# Altium PCB PCI Express Mini L1_V1.PCBDOC (part 8 of 9)
Units mm, origin at the board's own origin, x right, y up, seen from the top; angles counter-clockwise.
Board outline 70 x 83.2 mm, 6 copper layers (TopLayer, Layer 1, Layer 2, Layer 3, Layer 4, Bottom Layer), stack 0.914 mm thick; 442 components, 259 nets, 1412 pads, 857 vias.
Unrouted connection lines stored in the file: 2.
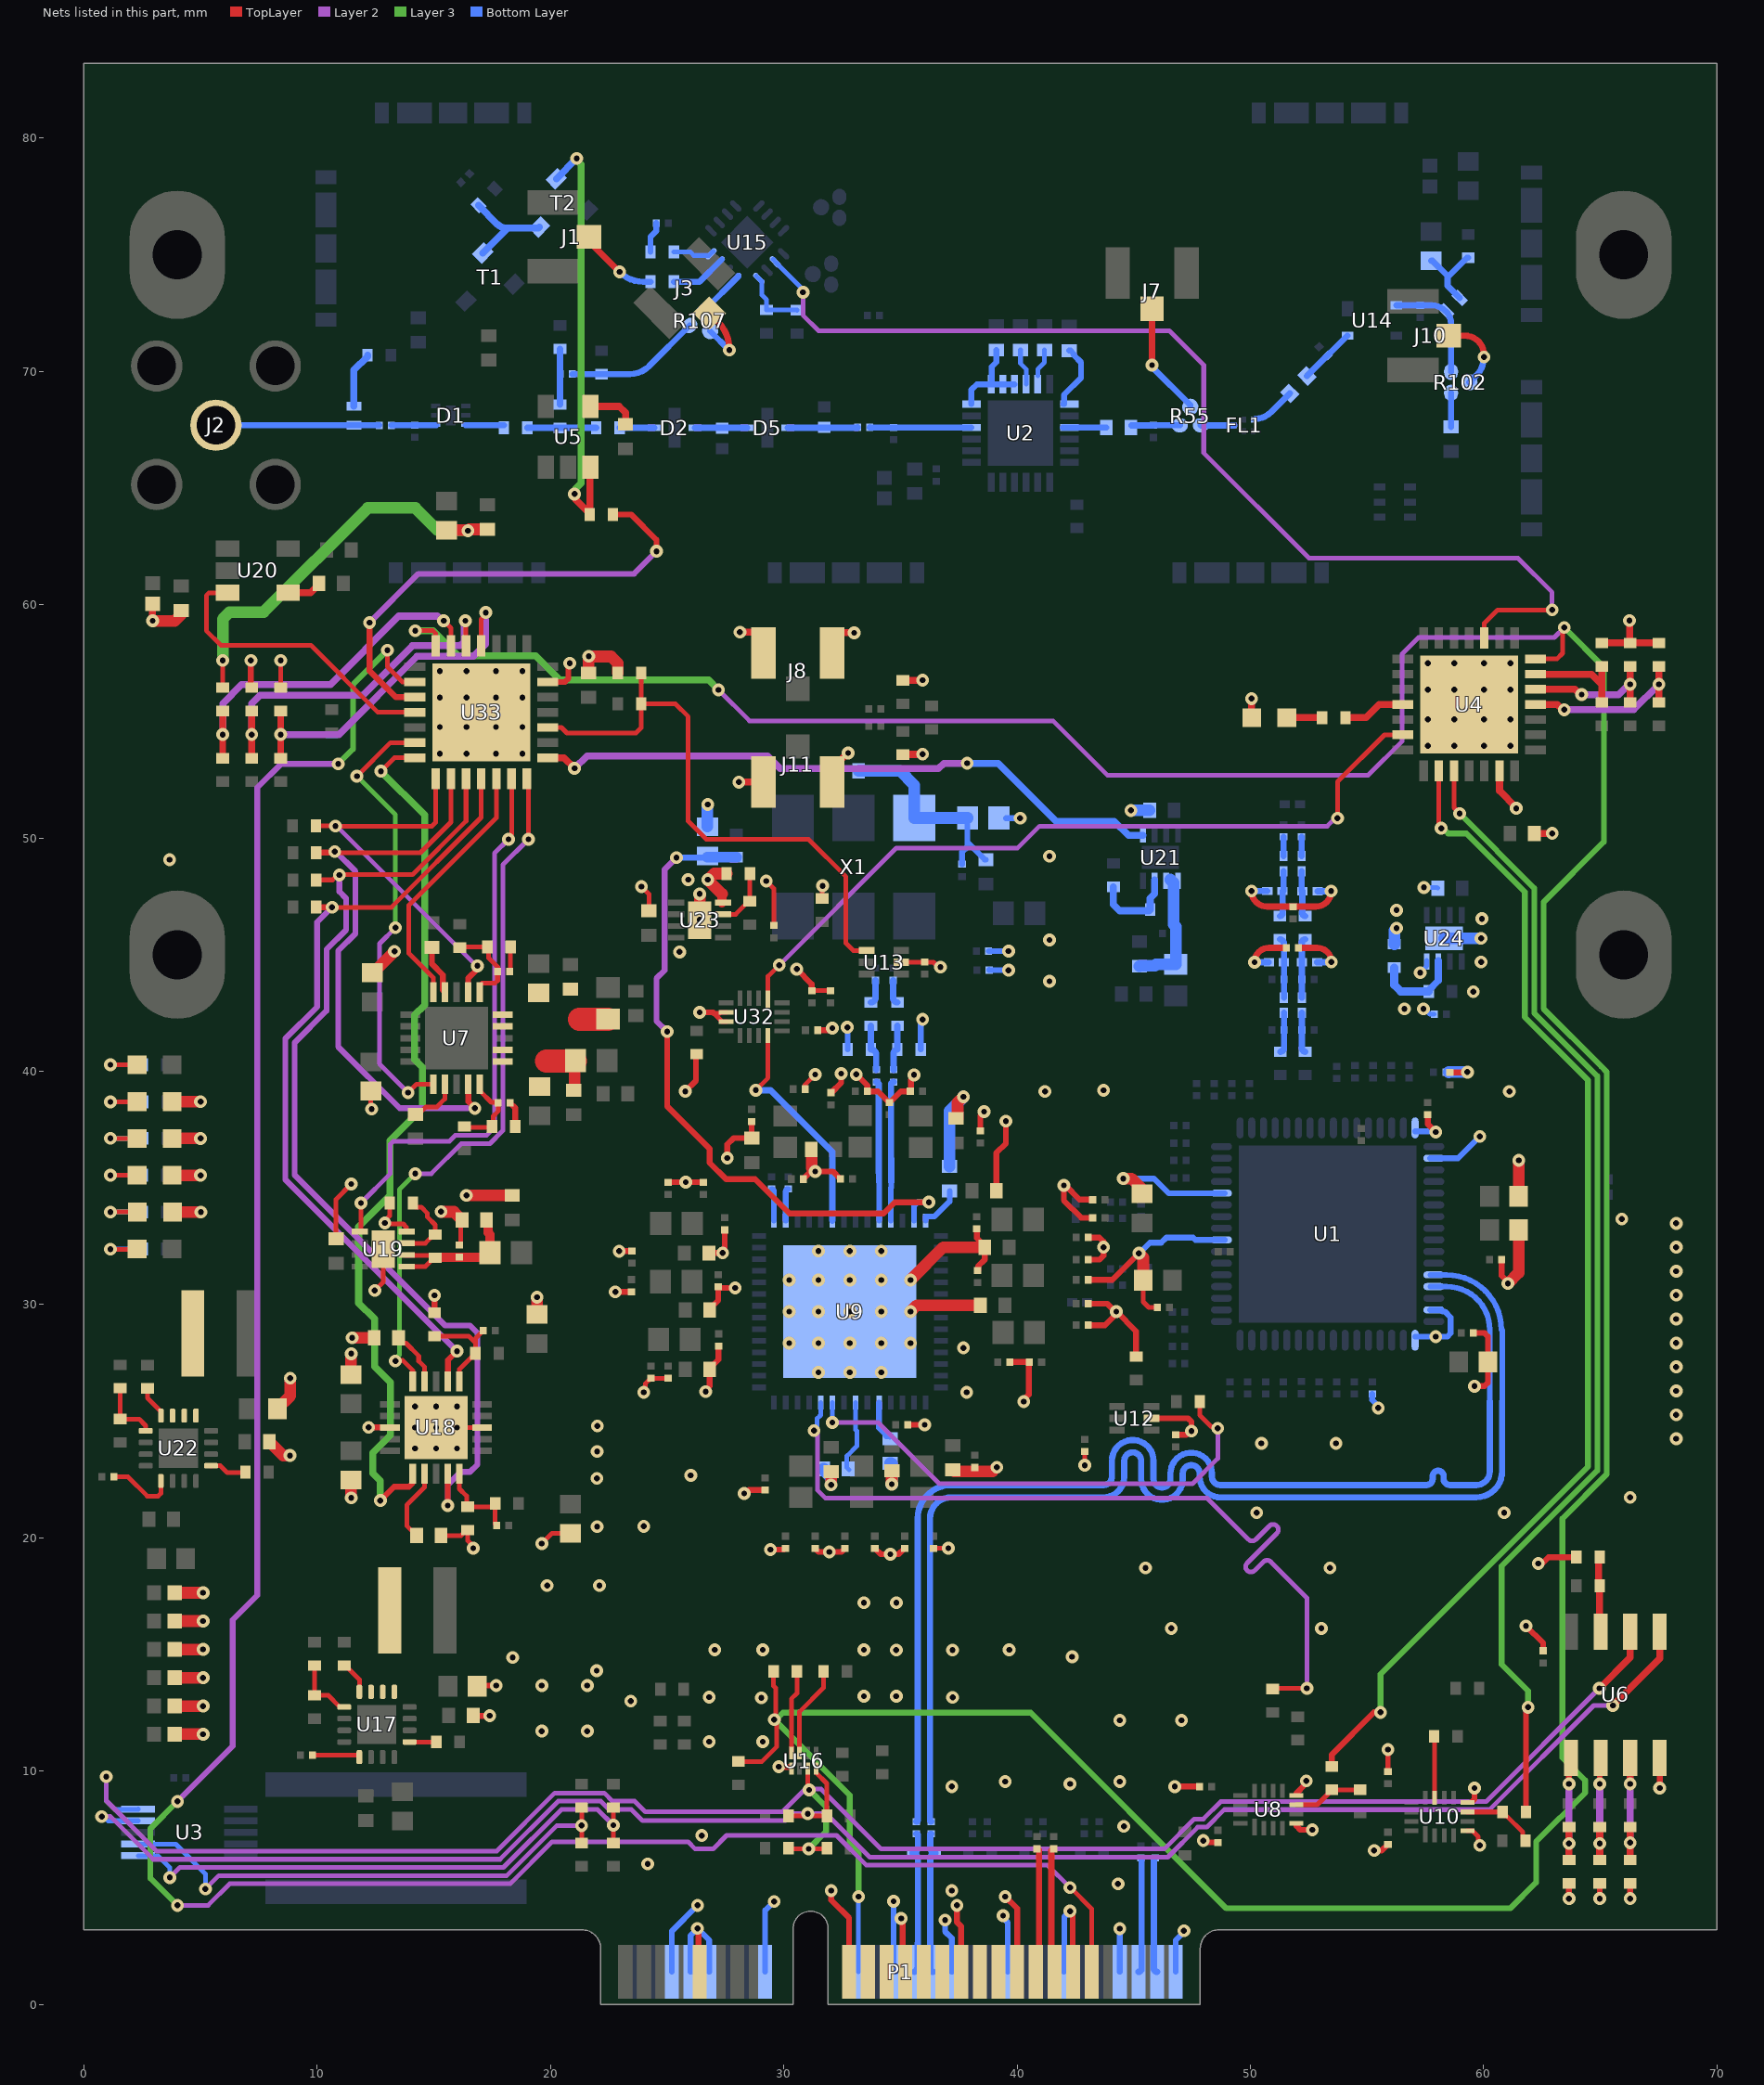
[diagram p8: the nets of this part, all layers, seen from the top]

## Via types
v1: diameter 0.55, hole 0.25, TopLayer to Bottom Layer, tented both sides, 782 vias
v2: diameter 0.55, hole 0.25, TopLayer to Bottom Layer, 40 vias
v3: diameter 0.5, hole 0.2, TopLayer to Bottom Layer, 25 vias
v4: diameter 0.35, hole 0.2, TopLayer to Bottom Layer, 10 vias

## Nets (pads, with @x,y where several pads share a name; then routed paths per layer and width w, separated by ;. In a path a pad name is that pad's centre, name@x,y a point inside that pad or via, vN(x,y) a via of type N, cw(c..) or ccw(c..) an arc to the next point about the centre after c; other vN are vias at no path point) (continued)
CMLout4_ADC_N: C38.1 U1.28 | length 53.9
  Bottom Layer w0.24: U1.28@57.708,31.275 58.408,31.275 cw(c58.408,28.923) 60.761,28.923 cw(c60.761,28.895) 60.789,28.895 60.789,25.857
  Bottom Layer w0.268: C38.1@36.319,7.841 cw(c36.319,7.895) 36.265,7.895 36.265,20.824 cw(c37.18,20.824) 37.18,21.738 43.304,21.738 43.702,21.738 ccw(c43.702,22.629) 44.592,22.629 44.592,23.305 cw(c44.955,23.305) 45.318,23.305 45.318,22.522 ccw(c46.208,22.522) 47.099,22.522 47.099,22.761 cw(c47.461,22.761) 47.824,22.761 47.824,22.629 ccw(c48.715,22.629) 48.715,21.738 55.688,21.738 59.674,21.738 ccw(c59.674,22.853) 60.789,22.853 60.789,25.857
CMLout4_ADC_P: C39.1 U1.29 | length 53.9
  Bottom Layer w0.24: U1.29@57.708,30.775 58.408,30.775 cw(c58.408,28.923) 60.261,28.923 60.261,25.857
  Bottom Layer w0.268: C39.1@35.684,7.841 ccw(c35.684,7.895) 35.737,7.895 35.737,20.824 cw(c37.18,20.824) 37.18,22.266 43.304,22.266 43.702,22.266 ccw(c43.702,22.629) 44.064,22.629 44.064,23.305 cw(c44.955,23.305) 45.846,23.305 45.846,22.522 ccw(c46.208,22.522) 46.571,22.522 46.571,22.761 cw(c47.461,22.761) 48.352,22.761 48.352,22.629 ccw(c48.715,22.629) 48.715,22.266 55.688,22.266 56.975,22.266 57.41,22.266 57.544,22.266 ccw(c57.544,22.534) 57.812,22.534 57.812,22.645 cw(c58.047,22.645) 58.283,22.645 58.283,22.534 ccw(c58.551,22.534) 58.551,22.266 59.468,22.266 59.674,22.266 ccw(c59.674,22.853) 60.261,22.853 60.261,25.857
CMLout4_N: C38.2 P1.26 R113.2 | length 6.3
  Bottom Layer w0.268: C38.2@36.319,7.321 ccw(c36.319,7.275) 36.272,7.275 36.272,6.729 ccw(c36.508,6.729) 36.508,6.493 ccw(c36.508,6.257) 36.272,6.257 36.272,1.528 ccw(c36.4,1.528) P1.26@36.4,1.4
CMLout4_P: C39.2 P1.24 R113.1 | length 6.3
  Bottom Layer w0.268: P1.24@35.6,1.4 ccw(c35.468,1.633) 35.736,1.634 35.736,2.55 cw(c36.1,2.55) 35.741,2.609 ccw(c35.476,2.653) 35.744,2.654 35.744,6.257 ccw(c35.508,6.257) R113.1@35.508,6.493 ccw(c35.508,6.729) 35.744,6.729 35.744,7.26 ccw(c35.684,7.26) C39.2@35.684,7.321
CTRL_VCXO: C222.1 R89.1 U9.41 | length 29
  TopLayer w0.25: v1(25.001,41.702) 25.001,38.505 26.823,36.683 26.823,36.082 27.526,35.379 28.769,35.379 30.242,33.905 34.27,33.905 34.754,34.389 v1(36.215,34.389)
  Layer 2 w0.25: v1(25.001,41.702) 24.54,42.163 24.54,43.982 24.887,44.329 24.887,48.654 v1(25.397,49.164)
  Bottom Layer w0.25: v1(25.397,49.164) 26.657,49.164 C222.1@26.728,49.235 ; R89.1@27.969,49.179 R89.1@28.06,49.088 ; U9.41@35.581,33.6 35.584,33.602 35.584,34.242 35.73,34.389 v1(36.215,34.389)
  Bottom Layer w0.45: C222.1@26.714,49.179 R89.1@27.969,49.179
EN_1V8_LDO1: U18.6 U33.21 | length 38.3
  TopLayer w0.2: v1(12.728,52.864) 13.305,53.441 U33.21@14.18,53.441
  TopLayer w0.25: v1(12.705,21.602) 13.297,22.195 13.931,22.195 14.078,22.341 14.078,22.742 U18.6@14.093,22.757
  Layer 3 w0.3: v1(12.705,21.602) 12.705,22.445 12.374,22.776 12.374,23.639 13.136,24.401 13.136,26.669 12.465,27.339 12.465,29.385 11.775,30.075 11.775,33.334 13.125,34.684 13.125,37.035 14.508,38.418 14.508,38.819 14.517,38.829 14.517,40.169 14.175,40.512 14.175,42.415 14.604,42.844 14.604,50.988 v1(12.728,52.864)
EN_1V25_LDO0: U7.20 U33.26 | length 11.1
  TopLayer w0.2: U7.20@14.97,43.398 14.97,44.017 13.926,45.061 13.926,47.115 17.68,50.869 U33.26@17.68,52.541
EN_1V25_LDO2: U19.5 U33.27 | length 24.3
  TopLayer w0.2: U19.5@11.877,33.13 v1(11.877,34.355) ; v1(18.2,49.95) 18.2,50.045 18.33,50.175 U33.27@18.33,52.541
  Layer 2 w0.2: v1(11.877,34.355) 13.136,35.614 13.136,36.883 13.253,37 15.663,37 15.914,37.25 17.255,37.25 17.604,37.599 17.604,49.355 v1(18.2,49.95)
EN_2V5_LDO0: U7.6 U33.20 | length 19.3
  TopLayer w0.2: v1(11.7,52.649) 13.142,54.091 U33.20@14.18,54.091 ; v1(13.892,39.088) 14.252,39.448 U7.6@14.97,39.448
  Layer 2 w0.2: v1(13.351,46.158) 12.667,45.474 12.667,40.313 v1(13.892,39.088)
  Layer 3 w0.2: v1(11.7,52.649) 13.351,50.999 v1(13.351,46.158)
EN_3V3_LDO1: U18.20 U33.28 | length 29.9
  TopLayer w0.2: v1(13.351,27.582) 13.387,27.618 13.659,27.618 14.093,27.184 U18.20@14.093,26.707 ; U33.28@18.98,52.541 19.053,52.468 v1(19.053,49.95)
  Layer 2 w0.2: v1(14.202,35.614) 14.892,35.614 16.178,36.9 17.4,36.9 17.954,37.454 17.954,48.852 v1(19.053,49.95)
  Layer 3 w0.2: v1(13.351,27.582) 13.351,27.677 13.525,27.851 13.525,34.937 v1(14.202,35.614)
EN_3V3_LDO3: U21.5 U33.1 | length 27.5
  TopLayer w0.3: U33.1@19.88,53.441 20.578,53.441 v1(21.028,52.991)
  Layer 2 w0.3: v1(21.028,52.991) 21.562,53.525 29.299,53.525 29.851,52.973 36.621,52.973 36.855,53.206 v1(37.855,53.206)
  Bottom Layer w0.3: v1(37.855,53.206) 39.193,53.206 41.682,50.718 44.165,50.718 44.769,50.114 U21.5@45.394,50.114
EN_5V: U20.3 U33.18 | length 12.9
  TopLayer w0.2: U20.3@6.158,60.512 5.362,60.512 5.244,60.395 5.244,58.888 5.877,58.256 9.734,58.256 12.599,55.391 U33.18@14.18,55.391
EN_ANT_SUPP: R32.1 U33.17 | length 20.8
  TopLayer w0.25: v1(12.244,59.232) 12.244,57.164 13.368,56.041 U33.17@14.18,56.041 ; R32.1@22.676,63.869 23.46,63.869 24.541,62.787 v1(24.541,62.29)
  Layer 2 w0.25: v1(12.244,59.232) 14.337,61.325 23.576,61.325 v1(24.541,62.29)
EN_RF_P: U4.17 U15.14 | length 46.6
  TopLayer w0.2: U4.17@60.025,58.575 60.025,59.209 60.594,59.779 v1(62.933,59.779)
  Layer 2 w0.2: v1(30.822,73.393) 30.822,72.414 31.484,71.751 46.52,71.751 48,70.272 48,66.507 52.509,61.997 61.467,61.997 62.933,60.531 v1(62.933,59.779)
  Bottom Layer w0.2: U15.14@29.529,74.796 U15.14@29.564,74.796 ; U15.14@29.635,74.69 30.755,73.571 30.755,73.46 v1(30.822,73.393)
EN_SPI_AD: R18.2 U4.3 | length 49.4
  TopLayer w0.2: U4.3@58.725,52.875 58.725,51.296 v1(58.971,51.05)
  TopLayer w0.25: R18.2@61.809,8.253 61.809,12.571 61.9,12.663 v2(61.9,12.744)
  Layer 3 w0.25: v1(58.971,51.05) 62.167,47.854 62.167,42.493 64.447,40.213 64.871,39.789 64.871,25.857 64.871,22.89 60.77,18.789 60.77,14.579 61.9,13.449 v2(61.9,12.744)
EN_SPI_LMK: R145.2 U4.2 | length 50.5
  TopLayer w0.2: U4.2@58.075,52.875 58.075,50.521 v1(58.178,50.418)
  TopLayer w0.25: R145.2@53.489,10.203 53.489,10.711 55.303,12.525 v2(55.575,12.525)
  Layer 3 w0.25: v2(55.575,12.525) 55.575,14.16 64.471,23.056 64.471,25.857 64.471,39.623 63.881,40.213 61.767,42.327 61.767,47.688 59.256,50.2 58.474,50.2 58.256,50.418 v1(58.178,50.418)
FB_3V6: R118.1 R121.2 U17.5 | length 2.8
  TopLayer w0.2: R118.1@9.881,14.528 R121.2@9.881,13.253 10.476,13.253 10.976,12.753 U17.5@11.156,12.753
FB_6V: R122.1 R125.2 U22.5 | length 2.7
  TopLayer w0.2: R122.1@1.56,26.417 R125.2@1.56,25.092 2.367,25.092 2.65,24.809 U22.5@2.65,24.592
FD_AD9690_3V3: R63.1 R117.2 U13.4 U33.3 | length 24.9
  TopLayer w0.2: U33.3@19.88,54.741 20.466,54.741 20.703,54.504 23.662,54.504 23.887,54.729 R63.1@23.887,55.751 ; R117.2@23.887,57.076 R63.1@23.887,55.751 ; U13.4@33.554,45.176 32.981,45.176 32.661,45.496 32.661,48.343 31.054,49.95 26.676,49.95 25.901,50.725 25.901,55.202 25.352,55.751 R63.1@23.887,55.751
GND: C19.2 C20.2 C23.1 C26.1 C37.1 C40.1 C43.1 C48.1 C49.1 C50.1 C52.1 C54.1 C55.1 C57.1 C58.2 C59.2 C60.1 C62.1 C64.1 C65.1 C70.1 C73.1 C74.1 C75.1 C76.1 C79.1 C80.1 C81.1 C88.1 C89.1 C91.1 C92.1 C94.1 C95.1 C96.1 C97.1 C126.1 C127.1 C132.1 C133.1 C134.1 C136.1 C137.1 C138.1 C139.1 C150.1 C151.1 C152.1 C153.1 C154.1 C155.1 C156.1 C157.1 C158.1 C159.1 C160.1 C161.1 C162.1 C163.1 C164.1 C165.1 C166.1 C167.1 C171.2 C172.2 C173.2 C174.1 C180.1 C181.1 C182.1 C184.1 C190.1 C191.1 C192.1 C193.1 C194.1 C195.1 C196.1 C197.1 C198.1 C199.1 C200.1 C201.1 C202.1 C203.1 C204.1 C205.1 C206.1 C207.1 C208.1 C211.1 C212.1 C213.1 C214.1 C215.1 C216.1 C217.1 C218.1 C222.2 C239.2 C240.1 C241.1 C242.1 C243.2 C244.2 D4.2 D6.2 D8.2 D9.2 D10.2 FB1.2 FB5.2 FB6.2 FB11.1 FB13.2 FB14.2 FB29.2 FB30.2 J8.1 J8.3 J11.1 J11.3 P1.6 P1.8 P1.9 P1.10 P1.16 P1.17 P1.22 P1.23 P1.28 P1.29 P1.34 P1.35 P1.40 P1.41 P1.46 P1.52 R20.1 R25.1 R26.1 R28.1 R35.1 R41.1 R45.1 R47.1 R53.1 R61.1 R65.1 R67.1 R70.1 R71.1 R79.2 R84.1 R97.1 R108.1 R109.1 R117.1 R119.1 R127.1 R131.1 U1.16 U1.18 U1.31 U1.33 U1.56 U1.60 U4.6 U4.29 U6.4 U8.5 U8.8 U9.57 U10.5 U10.8 U12.2 U13.2 U16.1 U18.3 U18.13 U18.21 U19.4 U19.9 U23.4 U23.9 U24.4 U24.9 U32.6 U32.7 U33.6 U33.29 | length 260.9
  TopLayer w0.2: R35.1@5.95,56.449 v1(5.95,57.61) ; R47.1@8.436,56.449 v1(8.436,57.61) ; C62.1@10.806,32.82 10.806,34.518 v1(11.454,35.166) ; C40.1@12.298,39.156 12.298,38.424 v1(12.336,38.385) ; v1(12.465,30.606) 12.827,30.967 U19.9@12.827,32.38 ; R53.1@13.106,34.355 13.106,33.802 12.9,33.596 v1(12.9,33.501) 12.94,33.461 13.682,33.461 13.827,33.316 U19.4@13.827,33.13 ; v1(15.093,24.732) v1(15.993,24.732) U18.13@17.068,24.732 ; C59.2@15.306,20.1 16.163,20.1 16.401,20.338 R65.1@16.451,20.338 16.451,19.885 16.685,19.651 v1(16.685,19.557) ; C64.1@16.087,32.555 16.097,32.555 16.147,32.605 16.147,33.571 C75.1@16.206,33.63 ; v2(19.625,19.761) 20.063,20.199 C54.1@20.848,20.199 ; v1(23.896,47.92) 24.221,47.595 C96.1@24.221,46.879 ; v1(23.993,26.24) 24.06,26.307 24.06,26.61 24.29,26.84 C182.1@24.3,26.84 C181.1@25.047,26.84 ; 26.861,42.532 26.954,42.532 ; U32.7@27.524,42.136 27.349,42.136 26.997,42.489 27.251,42.489 27.299,42.536 U32.6@27.524,42.536 ; v1(29.244,48.158) 29.571,47.831 C97.1@29.571,46.249 ; C158.1@30.915,39.238 30.915,39.435 v1(31.342,39.862) ; C240.1@31.199,43.456 C26.1@31.995,43.456 ; R61.1@31.639,47.41 31.65,47.421 31.65,47.942 v1(31.66,47.952) ; U13.2@35.034,44.676 36.414,44.676 36.622,44.468 v1(36.717,44.468) ; C196.1@36.425,19.557 v1(37.05,19.557) ; v1(42.9,23.112) C94.1@42.9,23.704 ; C80.1@45.404,31.05 45.404,30.122 45.645,29.881 C134.1@46.009,29.881 ; C20.2@55.895,9.978 v1(55.895,10.925) ; U10.5@59.303,7.453 59.503,7.453 59.768,7.188 59.768,6.888 v1(59.835,6.821)
  TopLayer w0.25: v1(7.155,57.61) 7.155,56.485 R45.1@7.192,56.449 ; v1(12.202,24.739) 12.204,24.737 13.112,24.737 U18.3@13.118,24.732 ; R67.1@15.023,29.65 15.023,30.394 v1(15.03,30.401) ; C59.2@15.306,20.1 C59.2@15.309,20.103 ; C49.1@16.685,12.389 16.706,12.368 17.377,12.368 v1(17.392,12.383) ; C48.1@16.856,13.643 16.881,13.668 v1(17.675,13.668) ; U33.6@19.88,56.691 20.62,56.691 20.767,56.837 20.767,57.434 v1(20.824,57.491) ; v1(22.779,30.545) C199.1@23.332,30.545 ; v1(22.943,32.292) C200.1@23.496,32.292 ; C212.1@25.047,35.248 v1(25.798,35.248) C211.1@26.548,35.248 ; v1(25.773,39.143) 26.237,39.607 26.237,40.711 R108.1@26.262,40.736 ; v1(26.298,3.26) 26.345,3.212 26.345,1.455 P1.9@26.4,1.4 ; v1(26.396,42.532) 26.861,42.532 ; v1(26.649,26.27) 26.649,26.338 26.823,26.512 C190.1@26.823,27.22 26.823,27.27 27.199,27.646 C184.1@27.199,28.227 ; C214.1@26.771,32.222 27.37,32.222 27.37,32.262 27.465,32.357 C213.1@27.465,33.201 ; C202.1@26.823,29.776 26.823,29.826 27.191,30.193 C201.1@27.191,30.767 ; 26.954,42.532 26.997,42.489 ; C201.1@27.232,30.712 v1(27.914,30.712) ; v1(27.576,36.288) 27.576,36.866 27.847,37.138 C161.1@28.624,37.138 C159.1@28.624,37.852 ; v1(28.3,21.904) 28.368,21.904 28.515,22.051 C152.1@29.195,22.051 ; v1(29.425,19.5) 30.007,19.5 C150.1@30.063,19.557 ; v2(29.786,10.188) v2@29.831,10.188 ; v2@29.832,10.187 U16.1@30.301,10.187 ; v1(30.555,44.382) 31.199,43.738 C240.1@31.199,43.456 ; C160.1@30.842,35.379 30.842,35.389 v1@31.199,35.746 ; C151.1@31.342,19.557 31.499,19.4 v1(31.95,19.4) 32.464,19.4 C166.1@32.621,19.557 ; v1(31.342,35.707) 32.103,35.707 32.387,35.424 32.397,35.424 32.422,35.399 C217.1@32.422,35.389 ; C239.2@31.446,41.763 31.906,41.763 31.995,41.852 v1(32.077,41.852) ; v1(32.028,4.882) 32.028,4.48 32.8,3.708 P1.17@32.8,1.4 ; C215.1@32.029,39.088 32.039,39.088 32.461,39.51 v1(32.461,39.902) ; v1(33.104,39.868) 33.581,39.391 C216.1@33.581,39.141 34.038,39.141 34.519,38.66 C154.1@34.529,38.66 34.539,38.66 35.019,39.141 C155.1@35.421,39.141 35.446,39.166 35.446,39.646 35.581,39.781 v1(35.581,39.849) ; C167.1@33.9,19.557 34.157,19.3 v1(34.565,19.3) 34.922,19.3 C195.1@35.179,19.557 ; v1(35.029,3.69) 35.029,3.622 35.098,3.553 35.098,1.502 P1.23@35.2,1.4 ; C174.1@35.306,24.851 v1(36.035,24.851) ; v1(37.42,4.252) 37.42,3.529 37.6,3.349 P1.29@37.6,1.4 ; C164.1@38.272,33.252 38.272,32.849 38.613,32.507 C194.1@38.613,32.457 38.613,31.929 38.338,31.654 38.338,31.494 38.313,31.469 C193.1@38.303,31.469 ; C156.1@38.427,37.453 38.427,38.109 v1(38.587,38.269) ; C165.1@39.111,34.881 39.111,36.506 39.52,36.915 v1(39.52,37.862) ; v1(39.488,4.625) 40,4.114 P1.35@40,1.4 ; C205.1@39.695,27.541 C204.1@40.529,27.541 40.5,27.513 40.5,26.144 40.282,25.927 v1(40.282,25.845) ; v1(42.268,4.003) 42.379,3.892 42.379,1.421 P1.41@42.4,1.4 ; C203.1@43.052,29.119 43.766,29.119 v1@44.278,29.632 ; C191.1@43.052,30.037 43.873,30.037 44.23,29.68 v1(44.254,29.704) 45.1,28.857 R109.1@45.1,27.77 R109.1@45.1,27.697 ; C192.1@43.052,31.053 C192.1@43.052,31.063 44.082,31.063 v1(45.221,32.201) ; C163.1@43.052,31.932 43.539,31.932 43.701,32.095 v1(43.701,32.46) 43.701,32.702 43.527,32.877 C162.1@43.052,32.877 ; C139.1@43.236,33.721 42.749,33.721 42,34.471 v1(42,35.11) 42.066,35.11 42.674,34.502 C138.1@43.236,34.502 ; U12.2@45.76,25.127 45.761,25.126 47.329,25.126 47.476,24.979 v1(47.476,24.577) 47.408,24.577 47.253,24.422 C95.1@46.8,24.422 ; v1(46.755,9.342) C244.2@47.815,9.342 ; v1(47.977,7.025) 48.059,7.025 48.137,6.947 C243.2@48.608,6.947 ; U8.5@51.97,7.658 52.141,7.488 v1(52.655,7.488) ; 51.97,9.058 52.357,9.445 52.357,9.545 v1(52.395,9.583) ; v1(55.303,6.6) 55.628,6.6 C19.2@55.895,6.868 ; C132.1@57.593,38.14 57.609,38.125 57.609,37.735 v1(57.943,37.402) ; C133.1@58.552,39.945 58.564,39.957 59.288,39.957 v1(59.3,39.968) ; U10.8@59.478,8.678 59.606,8.807 v1(59.606,9.278) ; C88.1@59.56,28.787 60.032,28.787 60.178,28.64 C73.1@60.178,27.541 60.178,26.651 60.032,26.504 v1(59.606,26.504) ; C89.1@60.77,31.925 60.77,31.241 61.039,30.971 v1(61.039,30.904) ; v1(61.809,16.228) 62.55,15.487 C50.1@62.55,15.17 ; v1(62.339,18.9) 62.503,18.9 62.778,19.175 R20.1@63.973,19.175 ; v1(63.656,4.54) R70.1@63.656,5.195 ; v1(64.973,4.54) R71.1@64.973,5.195 ; v1(66.275,4.54) R119.1@66.275,5.195 ; v1(67.545,9.274) U6.4@67.545,10.575
  TopLayer w0.3: v1(2.944,59.31) FB11.1@2.944,60.039 ; C70.1@17.173,63.113 C70.1@17.291,63.232 ; v1(28.071,52.398) J11.3@29.123,52.398 ; v1(28.117,58.826) 28.748,58.826 29.123,58.451 J8.1@29.123,57.926 ; J11.1@32.073,52.398 32.073,52.973 32.748,53.648 v1(32.757,53.648) ; J8.3@32.073,57.926 32.073,58.425 32.448,58.8 v1(33.015,58.8) ; R41.1@35.107,56.753 35.113,56.758 35.942,56.758 v1(35.948,56.764) ; R97.1@35.108,53.575 35.12,53.586 35.936,53.586 v1@35.938,53.589 ; v1(50.047,55.978) 50.053,55.972 50.053,55.169 D10.2@50.058,55.163 ; U4.6@60.675,52.875 60.678,52.872 60.678,52.024 61.392,51.311 v1(61.392,51.273) ; C241.1@62.175,50.2 v1(62.933,50.2) ; R28.1@65.066,58.36 R26.1@66.275,58.36 ; v1(66.25,59.325) 66.262,59.313 66.262,58.373 R26.1@66.275,58.36 ; R25.1@67.51,58.36 R26.1@66.275,58.36
  TopLayer w0.4: U23.4@27.346,47.229 27.346,47.606
  TopLayer w0.5: v1(2.944,59.31) 3.897,59.31 4.175,59.589 C60.1@4.175,59.75 ; D9.2@3.781,35.543 v1@5,35.543 ; D8.2@3.781,37.125 v1@5,37.125 ; D6.2@3.781,38.7 v1(5,38.7) ; D4.2@3.794,33.968 v1(5.013,33.968) ; FB1.2@3.889,11.588 v1(5.108,11.588) ; FB30.2@3.889,12.792 v1(5.108,12.791) ; FB13.2@3.889,14.006 v1(5.108,14.006) ; FB6.2@3.889,15.221 v1@5.108,15.221 ; FB14.2@3.889,16.435 v1(5.108,16.435) ; FB5.2@3.889,17.65 v1(5.108,17.65) ; C92.1@7.946,24.127 8.542,23.53 v1(8.835,23.53) ; C91.1@8.296,25.542 8.845,26.092 v1(8.845,26.85) ; v2(11.454,21.718) C52.1@11.454,22.482 ; C55.1@11.454,27.003 v1(11.454,27.896) ; v1(11.498,28.576) C58.2@12.439,28.574 C58.2@12.439,28.574 ; C43.1@12.411,44.352 12.537,44.352 13.311,45.127 v1(13.311,45.141) ; v1(15.302,33.988) 15.312,33.978 15.858,33.978 16.131,33.705 16.181,33.705 16.206,33.68 C75.1@16.206,33.63 ; C37.1@15.545,63.198 16.439,63.198 v1(16.462,63.175) 16.519,63.232 C70.1@17.291,63.232 ; v1(16.395,34.684) v1(16.395,34.684) 18.354,34.682 C76.1@18.356,34.68 ; v1(19.422,30.315) 19.423,30.313 19.423,29.579 C57.1@19.425,29.577 ; C242.1@21.636,57.076 v1(21.636,57.791) 21.645,57.781 22.594,57.781 22.887,57.488 R117.1@22.887,57.076 ; C96.1@24.221,46.879 C96.1@24.223,46.881 ; U23.9@26.396,46.479 v1(26.396,46.5) v1(26.396,47.606) ; 27.346,47.606 v1(26.739,48.214) 26.752,48.214 27.013,48.474 R127.1@27.546,48.474 ; C218.1@31.174,36.658 31.199,36.633 v1@31.199,35.851 ; C153.1@32.024,22.837 32.028,22.834 32.027,22.833 v1(32.027,22.276) ; v1(34.627,22.301) 34.627,22.872 C180.1@34.629,22.874 ; v1(35.431,29.7) 35.704,29.972 C206.1@38.427,29.972 ; v1(35.431,31.05) 36.839,32.457 C194.1@38.613,32.457 ; v1@35.938,53.589 v1(35.948,53.598) ; C198.1@37.237,22.914 37.3,22.851 38.949,22.851 v1(39.127,23.029) ; C157.1@37.375,37.983 37.425,37.983 37.45,38.008 37.45,38.665 v1@37.683,38.898 ; v1(44.551,35.403) 44.902,35.403 45.517,34.788 C81.1@45.517,34.738 ; v1(45.221,32.201) 45.404,32.018 C80.1@45.404,31.05 ; v1(61.039,30.904) 61.5,31.365 C79.1@61.5,33.2 ; C74.1@61.5,34.65 v1(61.5,36.182)
  Layer 3 w0.5: v1(5.95,57.61) 5.95,59.389 6.243,59.682 7.705,59.682 12.173,64.15 14.208,64.15 15.183,63.175 v1(16.462,63.175)
  Bottom Layer w0.2: v1@57.275,44.233 57.553,44.51 U24.4@57.553,44.7 U24.4@57.553,44.75 ; v1(57.414,42.675) 57.47,42.675 57.693,42.452 C127.1@57.883,42.452 ; v1(57.435,47.884) 57.994,47.884 C126.1@58.028,47.85
  Bottom Layer w0.25: P1.6@25.2,1.4 25.2,3.149 v1(26.303,4.252) ; P1.8@26,1.4 26,2.956 26.298,3.254 26.303,3.254 26.8,2.757 P1.10@26.8,1.4 ; P1.16@29.2,1.4 29.2,4.035 v1(29.581,4.417) ; v1(32.721,41.887) 32.721,41.852 32.685,41.815 cw(c32.685,41.767) 32.733,41.767 R84.1@32.733,40.937 ; v1(34.701,4.424) 34.701,1.499 P1.22@34.8,1.4 ; R79.2@35.866,40.937 35.866,42.143 v1(35.948,42.225) ; v1(36.912,3.622) 36.912,3.129 37.2,2.841 P1.28@37.2,1.4 ; C208.1@38.781,45.15 v1(39.633,45.15) ; C207.1@38.801,44.346 38.808,44.339 39.626,44.339 v1(39.633,44.332) ; v1(39.398,3.808) 39.398,3.712 39.6,3.511 P1.34@39.6,1.4 ; FB29.2@39.516,50.839 39.523,50.846 40.123,50.846 v1(40.13,50.854) ; P1.40@42,1.4 42.024,1.424 42.024,3.758 v1(42.268,4.003) ; P1.46@44.4,1.4 v1(44.4,3.254) ; v1(44.551,35.403) 45.866,35.403 46.495,34.775 U1.60@48.758,34.775 U1.60@48.908,34.775 ; v1(45.221,32.201) 45.24,32.201 45.69,32.652 46.177,32.652 46.4,32.875 47.541,32.875 47.641,32.775 U1.56@48.758,32.775 U1.56@48.908,32.775 ; P1.52@46.8,1.4 46.8,2.757 47.15,3.107 v1(47.15,3.161) ; C137.1@55.221,26.176 55.221,25.908 55.478,25.652 v1(55.478,25.57) ; U1.33@57.058,28.625 v1(57.943,28.625) 58.437,28.625 58.583,28.771 58.583,29.451 58.334,29.7 58.247,29.7 58.172,29.775 U1.31@57.858,29.775 U1.31@57.708,29.775 ; U1.16@57.058,37.425 57.92,37.425 v1(57.943,37.402) ; U1.18@57.708,36.275 U1.18@57.858,36.275 58.902,36.275 v1(59.835,37.208)
  Bottom Layer w0.5: C222.2@26.728,50.485 26.728,51.411 26.739,51.421 v1(26.739,51.435) ; C172.2@31.702,22.962 31.727,22.937 31.727,22.887 32.028,22.587 32.027,22.586 v1(32.027,22.276) ; C173.2@34.552,23.203 34.602,23.203 34.627,23.178 v1(34.627,22.301) ; C171.2@37.108,35.92 37.108,38.305 37.7,38.897 v1(37.7,38.911) ; v1(44.875,51.185) C65.1@45.677,51.185 ; R131.1@56.168,45.45 56.168,46.031 56.259,46.122 v1(56.259,46.136) ; U24.9@58.303,45.7 v1(59.888,45.7) ; C136.1@58.499,39.96 58.507,39.968 v1(59.3,39.968)
  other v1: 37.2,4.882 44.326,5.168 24.169,6.025 26.484,7.243 44.574,7.638 37.2,9.342 42.268,9.454 39.488,9.558 44.4,9.558 26.8,11.268 29.1,11.268 19.625,11.718 21.575,11.718 44.4,12.182 47.042,12.182 23.439,13.003 29.035,13.145 37.237,13.164 26.8,13.178 33.431,13.215 34.819,13.215 19.625,13.668 21.575,13.668 21.98,14.31 18.376,14.878 42.357,14.904 27.039,15.2 29.096,15.2 33.431,15.2 34.819,15.195 37.229,15.195 39.663,15.2 5.108,15.221 46.604,16.123 53.037,16.123 33.431,17.223 34.826,17.223 19.856,17.956 22.1,17.956 45.5,18.712 53.408,18.712 21.999,20.481 23.993,20.5 50.27,21.079 60.875,21.079 66.275,21.738 21.989,22.55 26.009,22.679 21.999,23.706 14.193,23.832 15.093,23.832 15.993,23.832 50.47,24.052 53.671,24.052 68.25,24.25 14.193,24.732 22.008,24.802 68.25,25.276 14.193,25.632 15.093,25.632 15.993,25.632 37.836,26.24 68.25,26.302 31.481,27.1 32.831,27.1 34.181,27.1 68.25,27.329 37.7,28.145 30.231,28.35 31.481,28.35 32.831,28.35 34.181,28.35 35.431,28.35 68.25,28.355 68.25,29.381 30.231,29.7 31.481,29.7 32.831,29.7 34.181,29.7 68.25,30.407 30.231,31.05 31.481,31.05 32.831,31.05 34.181,31.05 68.25,31.434 27.378,32.215 31.481,32.3 32.831,32.3 34.181,32.3 68.25,32.46 68.25,33.486 65.921,33.669 5,35.543 5,37.125 41.195,39.141 61.1,39.141 43.705,39.191 56.603,42.675 59.553,43.416 41.387,43.857 57.275,44.232 59.888,44.686 25.531,45.118 41.387,45.63 59.925,46.54 56.259,46.91 25.901,48.214 3.675,49.075 41.387,49.223 15.26,53.621 16.395,53.621 17.665,53.621 18.8,53.621 57.605,53.955 58.74,53.955 60.01,53.955 61.145,53.955 15.26,54.756 16.395,54.756 17.665,54.756 18.8,54.756 57.605,55.09 58.74,55.09 60.01,55.09 61.145,55.09 15.26,56.026 16.395,56.026 17.665,56.026 18.8,56.026 57.605,56.36 58.74,56.36 60.01,56.36 61.145,56.36 15.26,57.161 16.395,57.161 17.665,57.161 18.8,57.161 57.605,57.495 58.74,57.495 60.01,57.495 61.145,57.495
GND_VCXO: C177.1 C209.1 C210.1 FB29.1 X1.3 | length 9.5
  Bottom Layer w0.25: C209.1@37.639,48.874 37.639,49.398 37.87,49.629 37.87,49.818 ; FB29.1@37.87,50.86 37.87,49.818 ; C210.1@38.664,49.074 38.614,49.074 37.87,49.818
  Bottom Layer w0.5: C177.1@33.207,52.881 34.976,52.881 35.586,52.271 X1.3@35.586,50.86 FB29.1@37.87,50.86
I2C_SCL: R17.2 R51.2 U3.5 U6.6 U16.3 | length 83.1
  TopLayer w0.2: R51.2@30.2,6.705 30.232,6.673 v2(31.067,6.673) 31.817,6.673 R17.2@31.849,6.705 ; U16.3@31.026,10.109 31.026,9.342 31.051,9.317 31.051,9.236 v1(31.087,9.2)
  TopLayer w0.3: v1(64.953,13.551) 66.275,14.872 U6.6@66.275,15.975
  Layer 2 w0.2: v1@0.958,9.942 0.958,8.737 3.12,6.575 17.692,6.575 20.181,9.064 22.301,9.064 22.651,8.714 23.607,8.714 24.058,8.263 29.944,8.263 30.908,9.228 30.936,9.2 v1(31.087,9.2) 31.238,9.2 31.238,9.223 31.249,9.234 31.603,9.234 34.169,6.668 46.312,6.668 47.594,7.95 47.983,7.95 48.735,8.703 60.105,8.703 v1(64.953,13.551)
  Layer 3 w0.25: v2(31.067,6.673) 31.817,7.422 31.817,8.47 v1(31.087,9.2)
  Bottom Layer w0.2: v1(0.958,9.764) 0.958,8.725 1.313,8.37 2.319,8.37 U3.5@2.324,8.375
I2C_SDA: R16.1 R50.2 U3.4 U6.5 U16.4 | length 80
  TopLayer w0.2: R50.2@30.2,8.088 31.023,8.088 31.842,8.088 31.842,9.478 31.376,9.944 U16.4@31.376,10.109
  TopLayer w0.3: v1(65.536,12.82) 67.545,14.829 U6.5@67.545,15.975
  Layer 2 w0.2: v1@0.707,8.055 1.145,8.055 2.975,6.225 17.837,6.225 20.326,8.714 22.156,8.714 22.506,8.364 23.462,8.364 23.947,7.879 30.066,7.879 30.366,8.179 v2(31.023,8.179) 31.821,8.179 33.682,6.318 46.457,6.318 47.739,7.6 48.128,7.6 48.88,8.353 60.25,8.353 64.717,12.82 v1(65.536,12.82)
  Bottom Layer w0.2: v1(0.763,8.055) 0.858,8.055 1.038,7.875 U3.4@2.324,7.875
LMK_CLKin1_N: C225.2 U9.29 | length 1.4
  Bottom Layer w0.24: C225.2@29.468,34.96 cw(c29.468,34.847) 29.581,34.847 29.581,34.386 U9.29@29.581,33.6
LMK_CLKin1_P: C226.2 U9.30 | length 1.4
  Bottom Layer w0.24: U9.30@30.081,33.6 30.081,34.855 cw(c30.187,34.855) C226.2@30.187,34.96
LMK_CLKsel: U9.34 U32.12 | length 9.9
  TopLayer w0.2: v1(28.797,39.192) 29.324,39.719 U32.12@29.324,41.536
  Bottom Layer w0.279: v1(28.797,39.192) 29.437,39.192 32.081,36.548 32.081,35.262 U9.34@32.081,33.6
LMK_CLKsel_3.3: U4.27 U32.1 | length 33.4
  TopLayer w0.2: U32.1@29.324,43.086 29.324,44.075 v1(29.801,44.552) ; v1(53.732,50.854) 53.732,52.409 55.749,54.425 U4.27@56.525,54.425
  Layer 2 w0.2: v1(29.801,44.552) 34.822,49.573 40.023,49.573 40.961,50.511 53.295,50.511 53.638,50.854 v1(53.732,50.854)
NetC1_1: C1.1 R2.2 R3.1 R6.2 | length 2.6
  Bottom Layer w0.268: R2.2@51.259,45.658 cw(c51.259,45.481) 51.436,45.481 R6.2@51.436,44.676 C1.1@51.436,43.949 R3.1@51.436,43.156
NetC2_1: C2.1 R3.2 R4.1 | length 1.8
  Bottom Layer w0.268: R4.1@51.279,40.841 ccw(c51.279,40.999) 51.436,40.999 C2.1@51.436,41.775 R3.2@51.436,42.506
NetC3_2: C3.2 R1.1 | length 0.8
  Bottom Layer w0.268: R1.1@51.42,49.223 C3.2@51.42,50.048
NetC4_2: C4.2 R5.1 R9.2 | length 5.4
  TopLayer w0.268: v1(50.047,47.729) ccw(c50.717,47.729) 50.717,47.06 C4.2@51.825,47.06 52.793,47.06 ccw(c52.793,47.729) v1(53.462,47.729)
  Bottom Layer w0.268: v1(50.047,47.729) R5.1@50.725,47.729 ; R9.2@52.879,47.724 53.462,47.724 v1(53.462,47.729)
NetC5_1: C5.1 R8.2 | length 2.4
  TopLayer w0.268: C5.1@52.058,45.294 52.864,45.294 cw(c52.864,44.686) v1(53.472,44.686)
  Bottom Layer w0.268: R8.2@52.856,44.676 53.472,44.676 v1(53.472,44.686)
NetC5_2: C5.2 R6.1 | length 2.3
  TopLayer w0.268: v1(50.175,44.676) cw(c50.794,44.676) 50.794,45.294 C5.2@51.538,45.294
  Bottom Layer w0.268: v1(50.175,44.676) R6.1@50.786,44.676
NetC6_2: C6.2 R10.1 | length 0.8
  Bottom Layer w0.268: R10.1@52.195,49.223 C6.2@52.195,50.048
NetC7_2: C7.2 R8.1 R11.2 R12.1 | length 2.6
  Bottom Layer w0.268: R12.1@52.206,43.156 C7.2@52.206,43.949 R8.1@52.206,44.676 52.206,45.52 cw(c52.343,45.52) R11.2@52.343,45.658
NetC8_2: C8.2 R12.2 R13.1 | length 1.7
  Bottom Layer w0.268: R12.2@52.206,42.506 C8.2@52.206,41.775 52.206,40.985 ccw(c52.349,40.985) R13.1@52.349,40.841
NetC11_1: C11.1 U2.13 | length 2.9
  Bottom Layer w0.25: U2.13@41.964,68.6 42.014,68.6 42.014,69.001 42.741,69.728 42.741,70.39 42.437,70.694 42.437,70.744 42.287,70.894 C11.1@42.237,70.894
NetC12_1: C12.1 U2.11 | length 1.2
  Bottom Layer w0.2: U2.11@40.889,69.809 40.889,70.101 41.175,70.387 C12.1@41.175,70.918
NetC13_1: C13.1 U2.10 | length 1.6
  Bottom Layer w0.2: C13.1@40.145,70.918 40.145,70.344 40.389,70.1 U2.10@40.389,69.45
NetC14_1: C14.1 U2.6 U2.7 U2.8 U2.9 | length 4.1
  Bottom Layer w0.25: U2.6@38.039,68.6 38.039,69.217 38.272,69.45 U2.7@38.889,69.45 ; C14.1@39.11,70.918 39.11,70.4 38.914,70.204 38.914,69.475 U2.7@38.889,69.45 ; U2.9@39.889,69.45 U2.8@39.389,69.45 U2.7@38.889,69.45
NetC21_1: C21.1 J2.1 L2.1 | length 7
  Bottom Layer w0.268: J2.1@5.658,67.694 L2.1@11.575,67.694 C21.1@12.656,67.694
NetC21_2: C21.2 C252.2 D1.1 | length 1.9
  Bottom Layer w0.268: C21.2@13.176,67.694 D1.1@15.104,67.694
NetC22_1: C22.1 D5.1 L4.2 | length 3
  Bottom Layer w0.268: D5.1@30.17,67.582 33.152,67.582 33.168,67.598 C22.1@33.168,67.602
NetC22_2: C22.2 C253.2 U2.4 | length 4.4
  Bottom Layer w0.268: C22.2@33.688,67.602 C22.2@33.688,67.602 C253.2@34.698,67.601 ; U2.4@38.039,67.6 C253.2@34.699,67.6 ; C253.2@34.698,67.601 C253.2@34.699,67.6
NetC25_1: C25.1 U2.15 | length 1.9
  Bottom Layer w0.268: U2.15@41.964,67.6 U2.15@42.239,67.6 C25.1@43.825,67.6
NetC25_2: C25.2 C256.2 R55.2 | length 2.1
  Bottom Layer w0.268: C25.2@44.9,67.688 C256.2@45.841,67.688 ; C256.2@45.841,67.693 R55.2@46.973,67.693
NetC28_1: C28.1 C257.2 U14.1 | length 2.5
  Bottom Layer w0.268: C28.1@52.427,69.806 54.153,71.532 U14.1@54.165,71.532
NetC28_2: C28.2 FL1.D | length 1.9
  Bottom Layer w0.268: FL1.D@50.208,67.973 ccw(c50.208,68.904) 50.866,68.245 C28.2@51.684,69.063
NetC31_2: C31.2 L3.1 R46.1 | length 3.3
  Bottom Layer w0.268: C31.2@57.751,74.75 57.801,74.75 58.452,74.099 ; L3.1@58.971,73.152 58.452,73.672 58.452,74.099 ; R46.1@59.334,74.875 59.284,74.875 58.508,74.099 58.452,74.099
NetC32_1: C32.1 R102.1 | length 1.5
  Bottom Layer w0.268: C32.1@58.6,67.623 R102.1@58.6,69.085
NetC34_2: C34.2 U5.4 | length 2.1
  TopLayer w0.3: U5.4@21.705,68.501 22.936,68.501 23.212,68.225 C34.2@23.212,67.733
NetC41_1: C41.1 R57.1 R58.2 U7.16 | length 3.9
  TopLayer w0.2: R58.2@16.141,45.332 17.341,45.332 17.341,44.865 17.731,44.475 C41.1@17.731,44.272 ; U7.16@16.97,43.398 16.97,43.683 17.06,43.773 17.614,43.773 17.731,43.89 C41.1@17.731,44.282
NetC41_2: C41.2 C42.2 C71.2 FB31.1 R57.2 U7.14 U7.15 | length 2.5
  TopLayer w0.2: C41.2@18.251,44.282 18.271,44.302 18.271,45.312 R57.2@18.291,45.332 ; C42.2@19.49,43.364 C42.2@19.627,43.5
  TopLayer w1: 21.242,42.236 FB31.1@22.463,42.236
NetC45_1: C45.1 R59.1 R60.2 U7.10 | length 3.6
  TopLayer w0.2: R60.2@16.314,37.587 17.496,37.587 17.541,37.632 17.541,38.072 17.756,38.287 C45.1@17.756,38.657 17.747,38.667 17.466,38.667 16.97,39.163 U7.10@16.97,39.448
NetC45_2: C45.2 C46.2 C67.2 FB7.1 R59.2 U7.11 U7.12 | length 3.6
  TopLayer w0.25: C45.2@18.276,38.657 18.276,38.647 18.491,38.432 R59.2@18.491,37.632
  TopLayer w0.5: C67.2@20.998,39.192 21.011,39.192 21.036,39.217 21.036,40.428 FB7.1@21.073,40.466
  TopLayer w1: 19.833,40.447 FB7.1@21.055,40.447
NetC47_1: C47.1 U7.19 | length 2.1
  TopLayer w0.25: C47.1@14.916,45.318 14.916,44.603 15.387,44.132 15.387,43.481 U7.19@15.47,43.398
NetC51_1: C51.1 U7.7 | length 2.3
  TopLayer w0.2: C51.1@14.16,38.022 C51.1@14.2,38.022 ; C51.1@14.205,38.022 C51.1@14.2,38.022 ; U7.7@15.47,39.448 15.47,38.817 15.134,38.48 14.658,38.48 C51.1@14.2,38.022
NetC53_1: C53.1 R64.1 R65.2 U18.10 | length 3.8
  TopLayer w0.2: U18.10@16.093,22.757 16.093,22.108 16.401,21.799 16.401,21.338 17.506,21.338 R64.1@17.631,21.463 ; R64.1@17.631,21.478 R64.1@17.631,21.463 ; C53.1@17.69,20.529 17.69,20.539 17.631,20.597 R64.1@17.631,21.463
NetC56_1: C56.1 R66.1 R67.2 U18.16 | length 4.5
  TopLayer w0.2: R67.2@15.027,28.65 16.495,28.65 16.783,28.362 ; U18.16@16.093,26.707 16.093,27.228 16.608,27.743 16.658,27.743 16.783,27.868 R66.1@16.783,27.918 16.783,28.362 ; C56.1@17.108,28.882 17.108,28.872 16.783,28.547 16.783,28.362
NetC58_1: C58.1 U18.19 | length 2.6
  TopLayer w0.2: C58.1@13.417,28.734 13.417,28.597 13.664,28.349 13.801,28.349 14.351,27.799 14.351,27.582 14.593,27.341 U18.19@14.593,26.707
NetC59_1: C59.1 U18.7 | length 3.1
  TopLayer w0.2: C59.1@14.256,20.1 13.835,20.521 13.835,21.409 14.593,22.167 U18.7@14.593,22.757
NetC63_2: C63.2 U20.4 | length 1.5
  TopLayer w0.3: U20.4@8.758,60.512 9.715,60.512 10.072,60.869 C63.2@10.072,60.919
NetC64_2: C64.2 C75.2 FB32.1 R19.2 U19.1 U19.2 | length 6.7
  TopLayer w0.2: U19.1@13.777,31.63 14.631,31.63 15.006,32.005 R19.2@15.056,32.005 14.956,32.105 13.802,32.105 U19.2@13.777,32.13
  TopLayer w0.4: R19.2@15.056,32.005 15.081,32.03 17.206,32.03 FB32.1@17.406,32.23 17.406,33.01 17.331,33.085 17.331,33.555 C75.2@17.256,33.63
NetC66_2: C66.2 C77.2 FB4.1 R56.2 U21.1 U21.2 | length 5.3
  Bottom Layer w0.5: C77.2@45.244,44.51 45.269,44.535 45.902,44.535 45.952,44.585 FB4.1@46.802,44.585 46.802,46.199 46.702,46.299 R56.2@46.702,46.935 46.702,48.083 46.568,48.217
NetC82_1: C82.1 R88.1 R107.1 | length 5.8
  Bottom Layer w0.268: C82.1@20.93,69.887 R88.1@22.185,69.887 23.392,69.887 ccw(c23.392,71.073) 24.23,70.234 R107.1@25.966,71.97
NetC82_2: C82.2 R86.2 R87.2 | length 2.4
  Bottom Layer w0.268: R86.2@20.41,68.582 R87.2@20.41,70.97
NetC85_2: C85.2 R106.1 | length 1.3
  Bottom Layer w0.25: R106.1@24.288,75.129 24.288,75.779 24.528,76.019 C85.2@24.528,76.363
NetC86_2: C86.2 U17.9 | length 2.1
  TopLayer w0.2: C86.2@9.796,10.671 C86.2@9.796,10.681 11.786,10.681 11.806,10.661 U17.9@11.806,10.603
NetC93_2: C93.2 U22.9 | length 2.9
  TopLayer w0.2: C93.2@1.283,22.621 1.886,22.621 2.711,21.795 3.182,21.795 3.3,21.912 U22.9@3.3,22.442
NetC171_1: C171.1 U9.42 | length 1.9
  Bottom Layer w0.25: U9.42@36.081,33.6 36.081,33.77 36.086,33.775 36.453,33.775 37.108,34.43 C171.1@37.108,34.87
NetC172_1: C172.1 U9.7 | length 3.1
  Bottom Layer w0.2: C172.1@32.803,22.912 32.701,23.013 32.701,23.507 32.725,23.53 33.127,23.932 33.127,24.589 33.081,24.635 U9.7@33.081,25.8
NetC173_1: C173.1 U9.5 | length 1.8
  Bottom Layer w0.25: U9.5@34.081,25.8 34.081,24.72 34.377,24.425 34.377,24.379 34.402,24.353 C173.1@34.552,24.353
  Bottom Layer w0.279: C173.1@34.552,24.353 C173.1@34.581,24.381
NetC175_2: C175.2 R90.1 | length 1.1
  Bottom Layer w0.268: C175.2@34.681,43.901 34.681,43.147 ccw(c34.876,43.147) R90.1@34.876,42.952
NetC176_1: C176.1 R79.1 R90.2 | length 2
  Bottom Layer w0.268: C176.1@34.706,40.063 34.706,40.778 cw(c34.866,40.778) R79.1@34.866,40.937 34.866,41.952 R90.2@34.876,41.952
NetC178_2: C178.2 R91.1 | length 1.1
  Bottom Layer w0.268: R91.1@33.733,42.954 ccw(c33.733,43.15) 33.928,43.15 C178.2@33.928,43.901
NetC179_1: C179.1 R84.2 R91.2 | length 2
  Bottom Layer w0.268: R91.2@33.733,41.954 R84.2@33.733,40.937 cw(c33.733,40.709) 33.961,40.709 C179.1@33.961,40.063
NetC259_2: C259.2 L3.2 R102.2 U14.3 | length 4.8
  Bottom Layer w0.268: U14.3@56.259,72.832 C259.2@57.275,72.832 57.751,72.832 cw(c57.751,71.932) L3.2@58.388,72.569 cw(c57.876,72.056) 58.6,72.056 R102.2@58.6,69.985
NetD1_6: D1.6 R40.1 | length 1.6
  Bottom Layer w0.268: D1.6@16.363,67.696 R40.1@17.997,67.696
NetD2_1: D2.1 D5.3 L1.2 | length 2.2
  Bottom Layer w0.268: D2.1@26.194,67.582 D5.3@28.42,67.582
NetD2_3: D2.3 R81.2 | length 1.5
  Bottom Layer w0.268: R81.2@22.96,67.582 D2.3@24.444,67.582
NetD3_1: D3.1 R77.1 | length 2.5
  TopLayer w0.2: v1(1.137,40.277) 2.275,40.277 D3.1@2.281,40.283
  Bottom Layer w0.2: v1(1.137,40.277) R77.1@2.53,40.277
NetD4_1: D4.1 R76.1 | length 2.6
  TopLayer w0.2: v1(1.137,33.968) D4.1@2.294,33.968
  Bottom Layer w0.2: v1(1.137,33.968) R76.1@2.531,33.968
NetD6_1: D6.1 R132.1 | length 2.6
  TopLayer w0.2: v1(1.137,38.687) 2.267,38.687 D6.1@2.281,38.7
  Bottom Layer w0.2: v1(1.137,38.687) R132.1@2.55,38.687
NetD7_1: D7.1 R80.1 | length 2.5
  TopLayer w0.2: v1(1.137,32.375) 2.275,32.375 D7.1@2.281,32.38
  Bottom Layer w0.2: v1(1.137,32.375) 1.14,32.378 2.528,32.378 R80.1@2.53,32.38
NetD8_1: D8.1 R78.1 | length 2.6
  TopLayer w0.2: v1(1.137,37.126) 2.279,37.126 D8.1@2.281,37.125
  Bottom Layer w0.2: v1(1.137,37.126) R78.1@2.55,37.126
NetD9_1: D9.1 R133.1 | length 2.5
  TopLayer w0.2: v1(1.137,35.543) D9.1@2.281,35.543
  Bottom Layer w0.2: v1(1.137,35.543) R133.1@2.531,35.543
NetD10_1: D10.1 R134.1 | length 1.5
  TopLayer w0.3: D10.1@51.558,55.163 R134.1@53.073,55.163
NetFL1_A: FL1.A R55.1 | length 1.4
  Bottom Layer w0.268: R55.1@47.873,67.693 47.878,67.688 FL1.A@49.311,67.688
NetJ1_2: J1.2 R100.1 | length 3.5
  TopLayer w0.268: J1.2@21.649,75.77 ccw(c22.119,75.77) 21.787,75.438 v1(22.96,74.264)
  Bottom Layer w0.268: v1(22.96,74.264) ccw(c23.972,75.276) 23.972,73.845 R100.1@24.288,73.845
NetJ3_2: J3.2 R107.3 | length 3
  TopLayer w0.268: J3.2@26.809,72.5 27.157,72.152 cw(c25.921,70.915) v1(27.67,70.915)
  Bottom Layer w0.268: R107.3@26.841,71.732 27.658,70.915 v1(27.67,70.915)
NetJ7_2: J7.2 R55.3 | length 4.9
  TopLayer w0.268: v1(45.785,70.274) J7.2@45.785,72.689
  Bottom Layer w0.268: v1(45.785,70.274) 45.785,70.198 47.423,68.56 R55.3@47.423,68.481
NetJ10_2: J10.2 R102.3 | length 3.4
  TopLayer w0.268: J10.2@58.495,71.532 59.19,71.532 cw(c59.19,70.712) 60.01,70.712 v1(60.01,70.617)
  Bottom Layer w0.268: R102.3@59.466,69.535 R102.3@59.387,69.535 59.685,69.832 ccw(c58.901,70.617) v1(60.01,70.617)
NetL2_2: L2.2 R31.2 | length 2.4
  Bottom Layer w0.3: L2.2@11.575,68.519 11.575,70.064 12.156,70.645 R31.2@12.156,70.695
NetL5_1: L5.1 U17.1 U17.2 U17.3
NetL6_1: L6.1 U22.1 U22.2 U22.3
NetR1_2: R1.2 R2.1 R5.2 | length 2
  Bottom Layer w0.268: R2.1@51.259,46.658 ccw(c51.259,46.775) 51.375,46.775 R5.2@51.375,47.729 ccw(c51.375,47.774) 51.42,47.774 R1.2@51.42,48.573
NetR9_1: R9.1 R10.2 R11.1 | length 2
  Bottom Layer w0.268: R10.2@52.195,48.573 52.195,47.758 ccw(c52.229,47.758) R9.1@52.229,47.724 52.229,46.773 ccw(c52.343,46.773) R11.1@52.343,46.658
NetR18_1: R18.1 R116.1 U10.7 | length 3.2
  TopLayer w0.2: U10.7@59.303,8.253 R18.1@60.809,8.253 60.809,8.203 60.934,8.078 60.984,8.078 61.669,7.392 61.669,7.143 R116.1@61.794,7.018
NetR19_1: R19.1 R53.2 U19.3 | length 3.3
  TopLayer w0.2: U19.3@13.777,32.63 14.631,32.63 15.006,33.005 R19.1@15.056,33.005 15.056,33.421 14.727,33.75 14.727,33.91 14.458,34.18 14.231,34.18 14.106,34.305 R53.2@14.106,34.355
NetR20_2: R20.2 R27.1 U6.7 | length 3.2
  TopLayer w0.3: R20.2@64.923,19.175 64.923,17.943 64.964,17.902 64.964,16.016 U6.7@65.005,15.975
NetR21_1: R21.1 R119.2 U6.3 | length 5.1
  TopLayer w0.3: R119.2@66.275,6.195 v1(66.275,6.935) R21.1@66.275,7.608 ; v1(66.275,9.454) U6.3@66.275,10.575
  Layer 2 w0.3: v1(66.275,6.935) v1(66.275,9.454)
NetR22_1: R22.1 R28.2 U4.13 | length 4.6
  TopLayer w0.3: U4.13@62.225,57.025 64.626,57.025 65.066,56.585 ; R22.1@65.066,55.81 65.066,56.585 ; R28.2@65.066,57.36 65.066,56.84 65.066,56.585
NetR23_1: R23.1 R25.2 U4.11 | length 7.4
  TopLayer w0.3: U4.11@62.225,55.725 63.157,55.725 63.382,55.5 v1(63.45,55.5) ; R23.1@67.51,55.81 v1(67.51,56.585) R25.2@67.51,57.36
  Layer 2 w0.3: v1(63.45,55.5) 66.425,55.5 v1(67.51,56.585)
NetR24_1: R24.1 R26.2 U4.12 | length 5.9
  TopLayer w0.3: U4.12@62.225,56.375 63.907,56.375 64.132,56.15 v1(64.2,56.15) ; R24.1@66.275,55.81 v1(66.275,56.585) R26.2@66.275,57.36
  Layer 2 w0.3: v1(64.2,56.15) 65.772,56.15 66.207,56.585 v1(66.275,56.585)
NetR29_2: R29.2 U10.11 | length 2.6
  TopLayer w0.2: U10.11@57.903,8.853 R29.2@57.903,11.492
NetR30_1: R30.1 R35.2 U33.13 | length 15.8
  TopLayer w0.2: v1(15.42,59.31) 15.73,59.001 U33.13@15.73,58.241
  TopLayer w0.279: R30.1@5.95,53.422 v1(5.95,54.435) R35.2@5.95,55.449
  Layer 2 w0.3: v1(5.95,54.435) 5.95,55.771 6.758,56.579 10.568,56.579 13.502,59.513 15.15,59.513 15.353,59.31 v1(15.42,59.31)
  Layer 3 w0.2: v1(5.95,54.435) v1@6.013,54.498
NetR32_2: R32.2 T2.1 U5.3 | length 19
  TopLayer w0.3: v1(21.028,64.748) 21.076,64.701 21.076,64.519 21.676,63.919 R32.2@21.676,63.869 21.688,63.881 21.688,65.884 U5.3@21.705,65.901
  Layer 3 w0.3: v1@21.076,64.743 21.076,64.973 21.306,65.203 21.306,78.876 21.121,79.062 v1(21.121,79.129)
  Bottom Layer w0.3: T2.1@20.248,78.257 v1(21.121,79.129)
NetR33_1: R33.1 R47.2 U33.11 | length 15.3
  TopLayer w0.2: U33.11@17.03,58.241 17.03,59.379 17.223,59.572 v1(17.223,59.667)
  TopLayer w0.279: R33.1@8.436,53.422 v1(8.436,54.435) R47.2@8.436,55.449
  Layer 2 w0.3: v1(8.436,54.435) 10.926,54.435 14.281,57.791 16.704,57.791 17.223,58.31 v1(17.223,59.667)
NetR34_1: R34.1 R45.2 U33.12 | length 15.6
  TopLayer w0.2: v1(16.35,59.31) 16.365,59.296 16.365,58.256 U33.12@16.38,58.241
  TopLayer w0.279: R34.1@7.192,53.422 v1(7.192,54.435) R45.2@7.192,55.449
  Layer 2 w0.3: v1(7.192,54.435) 7.192,55.771 7.55,56.129 11.971,56.129 14.083,58.241 16.127,58.241 16.303,58.417 16.303,59.263 v1(16.35,59.31)
NetR40_2: R40.2 R81.1 R86.1 | length 3
  Bottom Layer w0.268: R40.2@19.004,67.582 R81.1@21.96,67.582
NetR49_2: R49.2 T1.1 T2.3 | length 4.5
  Bottom Layer w0.3: R49.2@16.91,77.124 17.72,76.313 ccw(c18.149,76.742) 18.149,76.136 T1.1@17.093,75.08 ; 18.141,76.15 19.485,76.15 T2.3@19.529,76.194
NetR54_1: R54.1 R70.2 U6.1 | length 5.1
  TopLayer w0.25: v1(63.656,9.454) 63.656,10.496 U6.1@63.735,10.575
  TopLayer w0.3: R70.2@63.656,6.195 v1(63.656,6.902) R54.1@63.656,7.608
  Layer 2 w0.3: v1(63.656,6.902) v1(63.656,9.454)
NetR56_1: R56.1 R68.2 U21.3 | length 3.8
  Bottom Layer w0.3: R68.2@44.127,47.91 44.127,47.158 44.402,46.883 45.651,46.883 R56.1@45.702,46.935 45.702,47.42 45.894,47.612 U21.3@45.894,48.214
NetR62_1: R62.1 U17.13 | length 1.1
  TopLayer w0.2: U17.13@13.956,11.253 R62.1@15.106,11.253
NetR69_1: R69.1 R71.2 U6.2 | length 5.1
  TopLayer w0.25: v1(64.973,9.454) 64.973,10.543 U6.2@65.005,10.575
  TopLayer w0.3: R71.2@64.973,6.195 v1(64.973,6.902) R69.1@64.973,7.608
  Layer 2 w0.3: v1(64.973,6.902) v1(64.973,9.454)
NetR74_1: R74.1 U9.9 | length 21.8
  TopLayer w0.2: R74.1@47.829,25.845 47.829,25.262 48.323,24.768 48.531,24.768 v1(48.598,24.701)
  Layer 2 w0.2: v1(32.077,24.951) 34.04,24.951 36.666,22.325 47.52,22.325 48.598,23.403 v1(48.598,24.701)
  Bottom Layer w0.2: v1(32.077,24.951) 32.081,24.956 U9.9@32.081,25.8
NetR75_1: R75.1 U9.10 | length 36.1
  TopLayer w0.2: R75.1@50.955,13.519 50.987,13.551 v1(52.42,13.551)
  Layer 2 w0.2: v1(31.296,24.602) 31.452,24.447 31.452,22.038 31.788,21.701 48.149,21.701 49.842,20.008 49.913,19.937 ccw(c50.074,20.098) 50.234,19.937 50.81,20.514 cw(c50.971,20.353) 51.131,20.514 cw(c50.971,20.353) 51.131,20.193 49.861,18.922 ccw(c50.022,18.762) 49.861,18.601 ccw(c50.022,18.762) 50.182,18.601 50.555,18.974 cw(c50.716,18.814) 50.876,18.974 52.42,17.431 52.42,17.029 v1(52.42,13.551)
  Bottom Layer w0.2: v1(31.296,24.602) 31.431,24.737 31.431,25.119 31.581,25.269 U9.10@31.581,25.8
NetR93_1: R93.1 R103.1 U15.16 | length 2.8
  Bottom Layer w0.2: U15.16@28.928,73.983 29.059,73.852 29.059,73.282 29.257,73.084 R93.1@29.257,72.639 29.263,72.633 30.563,72.633 R103.1@30.569,72.627
NetR100_2: R100.2 U15.3 | length 2.4
  Bottom Layer w0.268: R100.2@25.288,73.845 26.386,73.845 U15.3@27.337,74.796
NetR106_2: R106.2 U15.4 | length 1.8
  Bottom Layer w0.2: R106.2@25.288,75.129 25.988,75.129 26.142,74.975 26.796,74.975 26.971,75.15 U15.4@26.984,75.15
NetR107_2: R107.2 U15.1 | length 2.1
  Bottom Layer w0.268: R107.2@26.603,72.607 26.603,72.627 28.044,74.069 U15.1@28.044,74.089
NetR110_1: R110.1 U16.8 | length 3.6
  TopLayer w0.2: U16.8@30.326,10.779 30.326,13.103 30.561,13.338 R110.1@30.561,14.278
NetR111_2: R111.2 R129.1 U3.2 | length 22.8
  TopLayer w0.2: R129.1@21.333,6.925 v1(21.333,7.673) R111.2@21.333,8.444
  Layer 2 w0.2: v1(5.207,4.95) 5.782,5.525 18.127,5.525 20.274,7.673 v1(21.333,7.673)
  Bottom Layer w0.2: U3.2@2.324,6.875 2.33,6.869 3.936,6.869 5.207,5.597 v1(5.207,4.95)
NetR112_2: R112.2 R130.1 U3.1 | length 24.1
  TopLayer w0.2: R130.1@22.691,6.875 R130.1@22.691,6.925 v1(22.691,7.684) R112.2@22.691,8.444 R112.2@22.691,8.494
  Layer 2 w0.2: v1(3.683,5.444) 4.114,5.875 17.982,5.875 20.471,8.364 22.011,8.364 v1(22.691,7.684)
  Bottom Layer w0.2: U3.1@2.324,6.375 3.179,6.375 3.684,5.87 3.684,5.575 3.683,5.573 v1(3.683,5.444)
NetR114_1: R114.1 U16.7 | length 3.9
  TopLayer w0.2: U16.7@30.676,10.779 30.676,12.553 31.702,13.579 R114.1@31.702,14.278
NetR115_1: R115.1 R145.1 U8.7 | length 3
  TopLayer w0.2: U8.7@51.97,8.558 52.862,8.558 R145.1@53.498,9.194 ; R145.1@53.489,9.203 R115.1@54.7,9.203
NetR123_1: R123.1 U22.13 | length 1.6
  TopLayer w0.2: U22.13@5.461,23.081 U22.13@5.45,23.092 5.849,23.092 6.139,22.802 6.9,22.802 R123.1@6.921,22.822 R123.1@6.91,22.833
NetR126_1: R126.1 R127.2 U23.3 | length 2.6
  TopLayer w0.2: U23.3@27.346,46.729 27.938,46.729 28.496,47.288 R126.1@28.546,47.288 R127.2@28.546,48.474
NetR128_1: R128.1 R131.2 U24.3 | length 3.8
  Bottom Layer w0.3: R128.1@57.643,43.425 57.643,43.475 58.053,43.885 U24.3@58.053,44.75
  Bottom Layer w0.35: R131.2@56.168,44.45 56.168,43.702 56.445,43.425 R128.1@57.643,43.425
NetR134_2: R134.2 U4.25 | length 2.7
  TopLayer w0.3: R134.2@54.073,55.163 54.962,55.163 55.523,55.725 U4.25@56.525,55.725
O1_N: C189.2 P1.48 | length 5
  Bottom Layer w0.268: P1.48@45.2,1.4 ccw(c45.2,1.536) 45.336,1.536 45.336,6.253 ccw(c45.306,6.253) C189.2@45.306,6.283
O1_P: C188.2 P1.50 | length 5
  Bottom Layer w0.268: C188.2@45.93,6.283 ccw(c45.93,6.218) 45.864,6.218 45.864,1.536 ccw(c46,1.536) P1.50@46,1.4
O3_N: C227.2 P1.39 | length 5.6
  TopLayer w0.268: P1.39@41.469,1.531 ccw(c41.6,1.531) P1.39@41.6,1.4 cw(c41.6,1.536) 41.464,1.536 41.464,6.573 cw(c41.564,6.573) C227.2@41.564,6.673
O3_P: C228.2 P1.37 | length 5.4
  TopLayer w0.268: P1.37@40.8,1.4 ccw(c40.8,1.536) 40.936,1.536 40.936,6.587 ccw(c40.85,6.587) C228.2@40.85,6.673
OSCIN_N: C179.2 U9.38 | length 6
  Bottom Layer w0.24: U9.38@34.081,33.6 34.081,35.262
  Bottom Layer w0.268: C179.2@33.961,39.543 cw(c33.961,39.435) 34.07,39.435 34.07,35.66 ccw(c34.109,35.66) 34.081,35.632 34.081,35.262
OSCIN_P: C176.2 U9.39 | length 6
  Bottom Layer w0.24: U9.39@34.581,33.6 34.581,35.006 ccw(c34.581,35.034) 34.609,35.034 34.609,35.262
  Bottom Layer w0.268: 34.609,35.262 34.609,36.242 ccw(c34.57,36.242) 34.598,36.27 34.598,39.435 cw(c34.706,39.435) C176.2@34.706,39.543
PER0_N: P1.21
PER0_P: P1.19
PER1_N: P1.27
PER1_P: P1.25
PER2_N: P1.33
PER2_P: P1.31
PERST2#: P1.43 U33.16 | length 106.8
  TopLayer w0.2: v2(13.009,58.051) 13.009,57.335 13.653,56.691 U33.16@14.18,56.691 ; v1(42.268,5.01) 42.288,5.01 43.2,4.098 P1.43@43.2,1.4
  Layer 2 w0.2: v1(4.01,4.252) 5.322,4.252 6.245,5.175 18.272,5.175 20.072,6.975 25.893,6.975 26.2,6.668 26.97,6.668 27.55,7.248 32.257,7.248 33.537,5.968 41.31,5.968 v1(42.268,5.01)
  Layer 2 w0.25: v1(4.01,8.707) 6.375,11.072 6.375,16.483 7.435,17.543 7.435,52.162 8.454,53.181 v1(10.898,53.181)
  Layer 3 w0.25: v1(4.01,4.252) 2.85,5.412 2.85,7.547 v1(4.01,8.707) ; v1(10.898,53.181) 11.535,53.817 11.535,56.577 v2(13.009,58.051)
PERST#: P1.18 R72.2 R110.2 U4.14 U33.14 | length 173.4
  TopLayer w0.2: v1(14.205,58.888) 14.962,58.888 15.08,58.771 U33.14@15.08,58.241 ; R72.2@28.05,10.419 29.064,10.419 29.7,11.055 29.7,12.2 29.657,12.243 29.657,13.566 29.561,13.662 R110.2@29.561,14.278 ; U4.14@62.225,57.675 63.139,57.675 63.383,57.919 63.383,58.958 v1(63.45,59.025)
  Layer 2 w0.2: v1(27.201,56.35) 28.528,55.023 41.542,55.023 43.868,52.698 55.052,52.698 56.507,54.152 56.507,57.9 57.207,58.6 63.025,58.6 v1(63.45,59.025)
  Layer 3 w0.25: v2(29.59,12.213) 29.671,12.213 29.963,12.506 40.585,12.506 48.962,4.128 61.143,4.128 62.246,5.231 62.246,6.975 64.346,9.075 64.346,9.612 63.375,10.584 63.375,20.828 65.271,22.724 65.271,39.98 65.037,40.213 62.567,42.683 62.567,47.252 65.15,49.835 65.15,57.325 v1(63.45,59.025) ; v2@29.621,12.182 32.831,8.972 32.831,6.94 33.201,6.57 v1(33.201,4.625)
  Layer 3 w0.3: v1(14.205,58.888) 14.959,58.888 16.039,57.807 19.368,57.807 20.4,56.775 26.776,56.775 v1(27.201,56.35)
  Bottom Layer w0.2: P1.18@33.2,1.4 33.201,1.401 v1(33.201,4.625)
PG_1V8_1: R52.2 U18.17 U33.25 | length 34.7
  TopLayer w0.2: v1(10.637,47.031) 13.178,47.031 17.03,50.883 U33.25@17.03,52.541
  TopLayer w0.25: R52.2@9.992,47.042 10.001,47.034 v1@10.64,47.034 ; U18.17@15.593,26.707 15.608,26.722 15.608,27.621 v1(15.993,28.006)
  Layer 2 w0.25: v1(10.637,47.031) 10,46.394 10,42.765 8.635,41.4 8.635,35.364 v1(15.993,28.006)
PG_1V25_0: R37.2 U7.17 U33.22 | length 16.9
  TopLayer w0.2: R37.2@9.946,50.52 v1@10.779,50.52 ; v1(10.779,50.511) 14.921,50.511 15.08,50.67 U33.22@15.08,52.541
  TopLayer w0.25: U7.17@16.47,43.398 16.47,43.989 16.87,44.389 v1(16.87,44.523)
  Layer 2 w0.2: v1(10.779,50.511) 10.83,50.511 16.819,44.523 v1(16.87,44.523)
PG_2V5_0: R38.2 U7.9 U33.23 | length 25.3
  TopLayer w0.2: v1(10.748,49.421) 10.803,49.366 14.417,49.366 15.73,50.679 U33.23@15.73,52.541
  TopLayer w0.25: R38.2@9.992,49.364 10.005,49.378 v1@10.748,49.378 ; U7.9@16.47,39.448 16.474,39.444 16.474,38.7 v1(16.757,38.418)
  Layer 2 w0.25: v1(10.748,49.421) 10.793,49.421 11.637,48.576 11.637,45.9 10.898,45.161 10.898,41.055 13.536,38.418 v1(16.757,38.418)
PG_3V3_1: R42.2 U18.9 U33.24 | length 43.4
  TopLayer w0.2: R42.2@9.958,48.199 9.965,48.206 10.657,48.206 10.867,48.416 v1(10.949,48.416) 10.964,48.43 14.082,48.43 16.38,50.728 U33.24@16.38,52.541
  TopLayer w0.25: U18.9@15.593,22.757 15.595,22.754 v1(15.595,21.385)
  Layer 2 w0.25: v1(10.949,48.416) 10.949,47.703 11.237,47.415 11.237,46.066 10.4,45.228 10.4,42.6 9.035,41.235 9.035,35.548 15.474,29.109 16.544,29.109 16.87,28.782 16.87,23.145 16.55,22.825 16.144,22.825 15.595,22.276 v1(15.595,21.385)
PG_3V6_DCDC: R120.2 U17.4 | length 1.4
  TopLayer w0.2: R120.2@11.156,14.528 11.206,14.528 11.806,13.928 U17.4@11.806,13.403
PG_6V_DCDC: R124.2 U22.4 | length 1.4
  TopLayer w0.2: R124.2@2.723,26.408 2.723,25.998 3.3,25.422 U22.4@3.3,25.242